# Altium PCB PCB1 - Copy.PcbDoc
Units mm, origin at the board's own origin, x right, y up, seen from the top; angles counter-clockwise.
Board outline 16 x 12 mm, 2 copper layers (Top Layer, Bottom Layer); 5 components, 7 nets, 19 pads, 7 vias.
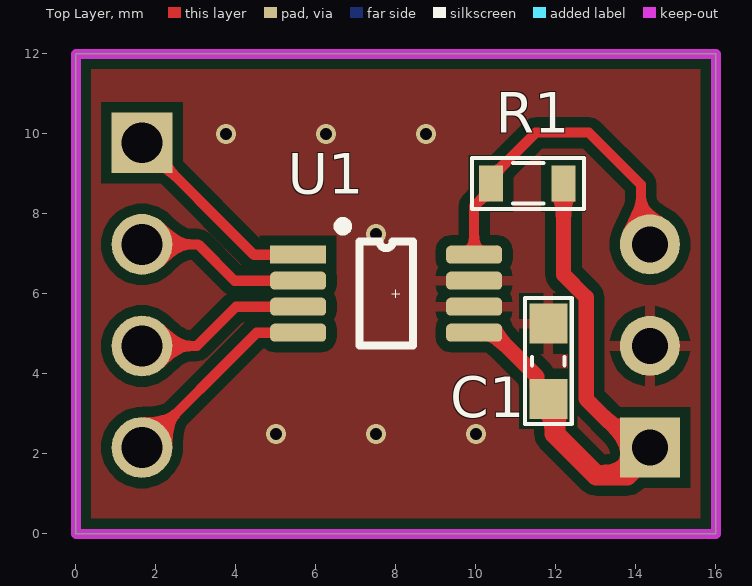
[diagram p0: Top Layer view]
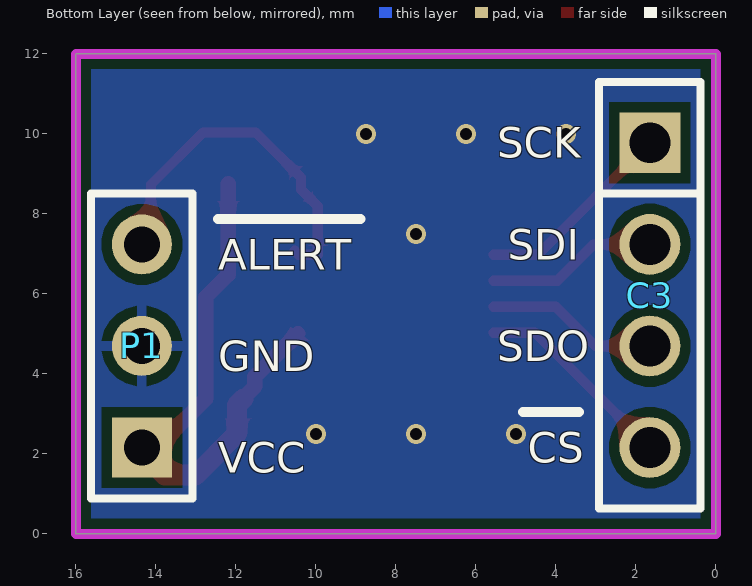
[diagram p1: Bottom Layer view, seen from below]

## Layer stack, top to bottom
Top Solder: solder mask 0.0102, Solder Resist, Dk 3.5
Top Layer: signal copper 0.0356
Dielectric 1: dielectric 0.32, FR-4, Dk 4.8
Bottom Layer: signal copper 0.0356
Bottom Solder: solder mask 0.0102, Solder Resist, Dk 3.5

## Board outline
0,0 0,12 16,12 16,0

## Design rules (kind name [scope] priority, off if disabled: settings)
Clearance [All] p1: gap=0.254 ignorepadtopadclearanceinfootprint=TRUE
PolygonConnect [All] p1: connectstyle=Relief reliefconductorwidth=0.254 reliefentries=4 polygonreliefangle="90 Angle" airgapwidth=0.254
RoutingVias [All] p1: holewidth=0.711 width=1.27 viastyle="Through Hole" minholewidth=0.2 minwidth=0.3 maxholewidth=0.711 maxwidth=1.27
SolderMaskExpansion [All] p1: expansion=0.102 istentingtop=FALSE
Width [All] p1: maxlimit=1.27 minlimit=0.254 preferedwidth=0.254 minimp=50.000000 maximp=50.000000 favimp=50.000000
30 further rules are at their usual default settings.

## Components (designator, comment, footprint, x,y, rotation, side; value= is the part's Value field where it differs from the comment)
C1 "100nF" CAP_0603 11.811,4.318 r270 top value=33p
C3 "JP4" JP4-C1T 1.651,9.779 r270 bottom
P1 "Header 3" HDR1X3 14.351,2.159 r90 bottom
R1 "10k" RES-SMD-0603 11.303,8.763 r180 top
U1 "TMAG5170" SOP8 8,6 r0 top

## Footprints (in the part's own frame and the unit in brackets; to place one, negate y for a bottom-side part, rotate by r counter-clockwise, add the part's x,y. Pads: shape width x height; smd on the part's side, far side on the other; paste and mask are expansions set on the pad)
CAP_0603 [mm]
  rect 1x0.95 smd mask+0.076: 1(-0.94,0) 2(0.94,0)
  silkscreen extent -1.57,-0.58 1.57,0.58, body extent -0.77,-0.39 0.83,0.41, height 0.9
HDR1X3 [mm] "Connector; Header; 3 Position"
  rect 1.5x1.5 hole 0.9: 1(0,0)
  round 1.5 hole 0.9: 2(2.54,0) 3(5.08,0)
  silkscreen extent -1.27,-1.27 6.35,1.27, body extent -1.27,-1.27 6.35,1.27, height 7
JP4-C1T [mm] "4 row, straight, gold plating"
  rect 1.52x1.52 hole 1.02: 1(0,0)
  round 1.52 hole 1.02: 2(2.54,0) 3(5.08,0) 4(7.62,0)
  silkscreen extent -1.52,-1.27 9.14,1.27, body extent -1.52,-1.25 9.14,1.25, height 8.51
RES-SMD-0603 [mm]
  rect 0.6x0.9 smd: 1(-0.889,0) 2(0.927,0)
  silkscreen extent -1.4,-0.64 1.4,0.64, body extent -0.8,-0.4 0.8,0.4, height 0.43
SOP8 [mm]
  rect 1.4x0.45 smd: 1(-2.444,0.98)
  rrect50% 1.4x0.45 smd: 2(-2.444,0.33) 3(-2.444,-0.32) 4(-2.444,-0.97) 5(1.956,-0.97) 6(1.956,-0.32) 7(1.956,0.33) 8(1.956,0.98)
  silkscreen extent -1.43,-1.29 0.42,1.8

## Part data
C1: library part CapSMD, "Capacitor", LatestRevisionDate=17-Jul-2002, LatestRevisionNote="Re-released for DXP Platform.", PackageReference=RAD-0.3, Published=8-Jun-2000, Publisher="Altium Limited"
C3: "WR-PHD 2.54 mm Angled Socket Header", Manufacturer="W¨¹rth Elektronik eiSos GmbH", partNo=613004143121, ComponentLink1 Description=Manufacturer, ComponentLink1URL=http://www.we-online.com, ComponentLink2 Description=Datasheet, ComponentLink2URL=http://katalog.we-online.de/em/datasheet/6130xx143121.pdf, Created by="Karrer Zheng", Created Date="29 March 2013", NoPins=04
P1: "Header, 3-Pin", LatestRevisionDate=17-Jul-2002, LatestRevisionNote="Re-released for DXP Platform.", Publisher="Altium Limited"
R1: library part "Resistor - SMD", "Resistor SMD", Manufacturer="Generic Components", Class=Passive, Published=08/06/2000, Publisher="Altium Hobart Technology Centre"

## Via types
v1: diameter 0.5, hole 0.3, Top Layer to Bottom Layer, 7 vias

## Nets (pads, with @x,y where several pads share a name; then routed paths per layer and width w, separated by ;. In a path a pad name is that pad's centre, name@x,y a point inside that pad or via, vN(x,y) a via of type N, cw(c..) or ccw(c..) an arc to the next point about the centre after c; other vN are vias at no path point)
3V3: C1.2 P1.1 R1.1 U1.5 | length 13.7
  Top Layer w0.381: U1.5@10.45,5.011 11.526,3.934 11.526,3.688 C1.2@11.811,3.403 ; R1.1 12.192,6.48 12.756,5.917 12.756,3.377 13.953,2.18 P1.1@14.224,1.909
  Top Layer w0.508: C1.2 11.974,3.215 11.974,2.504 13.01,1.468 13.784,1.468 P1.1@14.224,1.909
ALERT: P1.3 R1.2 U1.8 | length 9.3
  Top Layer w0.254: U1.8@10.529,7.078 10.431,6.98 U1.8 9.956,8.192 10.376,8.613 10.376,8.913 11.496,10.033 12.827,10.033 14.124,8.736 14.124,7.089 P1.3@14.224,6.989
CS: C3.4 U1.4 | length 5.1
  Top Layer w0.254: C3.4 4.522,5.03 U1.4
GND: C1.1 P1.2 U1.6 U1.7
  other v1: 5,2.5 7.5,2.5 10,2.5 7.5,7.5 3.75,10 6.25,10 8.75,10
MISO: C3.3 U1.3 | length 4.3
  Top Layer w0.254: C3.3 3.02,4.699 4.001,5.68 U1.3
MOSI: C3.2 U1.2 | length 4.3
  Top Layer w0.254: C3.2 3.056,7.239 3.965,6.33 U1.2
SCK: C3.1 U1.1 | length 5.1
  Top Layer w0.254: C3.1 4.45,6.98 U1.1

## Polygon pours and split planes (outlines as drawn)
GND on Top Layer "GND_L01_P000" (solid, pour order 0): 0.893,12.065 16.001,12.065 16.001,0 0.001,0 0.001,12.065 3.049,12.065
GND on Bottom Layer "GND_L02_P001" (solid, remove dead copper, pour order 1): 0,0 0,12.827 16.129,12.827 16.764,12.192 16.764,0

## Keep-outs
Keep-Out Layer:
  the board outline again, w0.254

## Silkscreen, mask and mechanical layers (free items; w line width, h text height)
Bottom Overlay:
  lines w0.254: 3.429,3.048 4.826,3.048 ; 8.89,7.874 12.446,7.874
  text "SCK" at 5.461,9.398 h0.76
  text "SDI" at 5.207,6.858 h0.76
  text "ALERT" at 12.446,6.604 h0.76
  text "SDO" at 5.461,4.318 h0.76
  text "GND" at 12.446,4.064 h0.76
  text "CS" at 4.699,1.778 h0.76
  text "VCC" at 12.446,1.524 h0.76